# Altium PCB Control_Board-v1.0.PcbDoc (part 3 of 3)
Units mil, origin at the board's own origin, x right, y up, seen from the top; angles counter-clockwise.
Board outline 6234.87 x 2703.42 mil, 2 copper layers (Top Layer, Bottom Layer), stack 57 mil thick; 64 components, 54 nets, 227 pads, 139 vias.
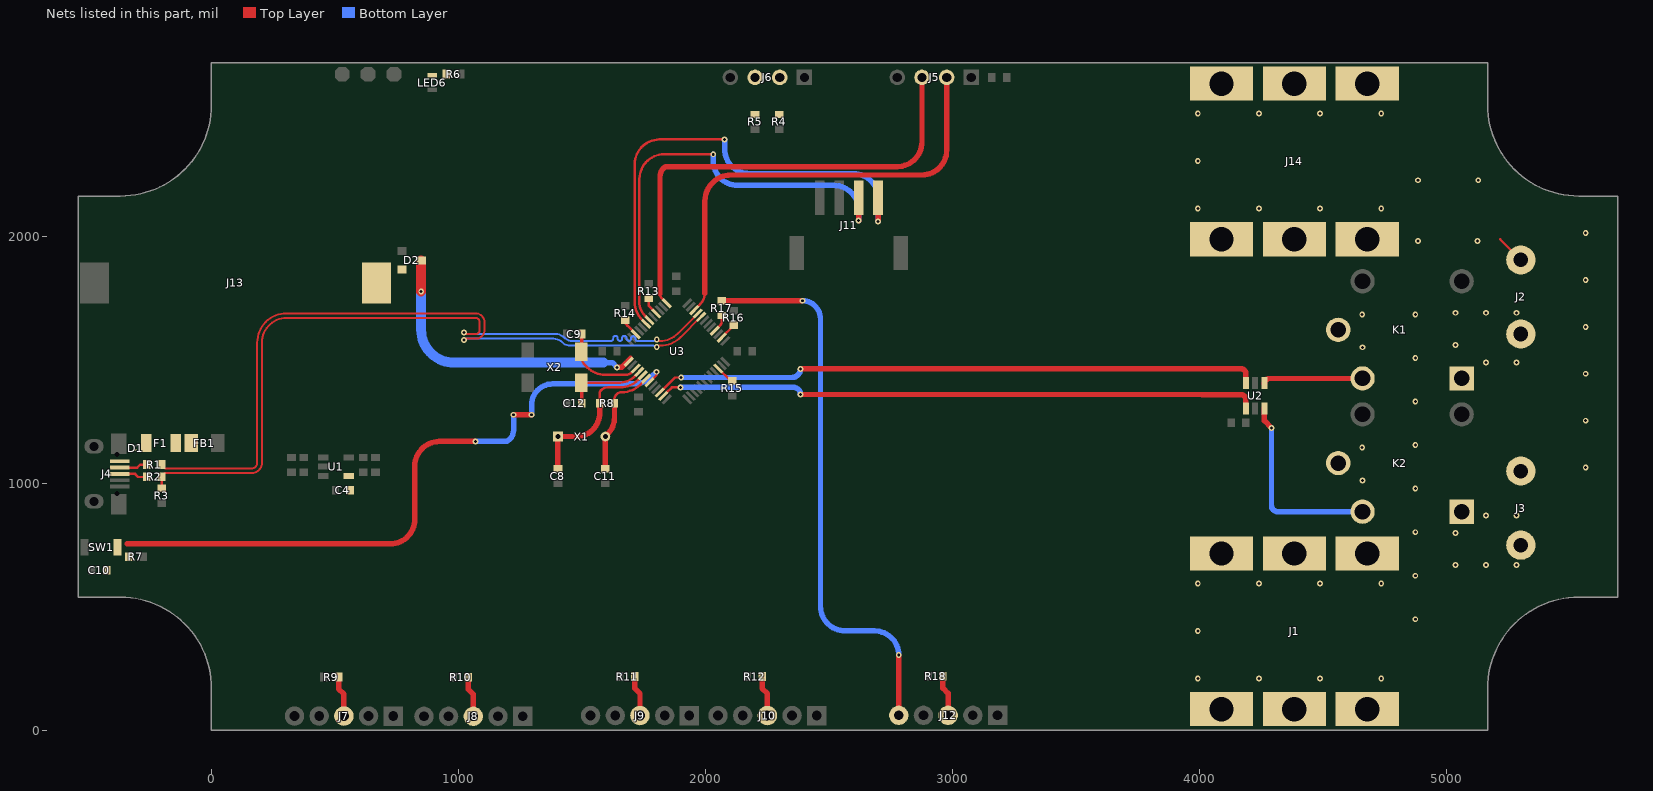
[diagram p2: the nets of this part, all layers, seen from the top]

## Via types
v1: diameter 23.62, hole 11.81, Top Layer to Bottom Layer, tented both sides, 131 vias
v2: diameter 23.62, hole 11.81, Top Layer to Bottom Layer, 8 vias

## Nets (pads, with @x,y where several pads share a name; then routed paths per layer and width w, separated by ;. In a path a pad name is that pad's centre, name@x,y a point inside that pad or via, vN(x,y) a via of type N, cw(c..) or ccw(c..) an arc to the next point about the centre after c; other vN are vias at no path point) (continued)
LED5_LAT: J12.5 R17.2 | length 2279.9
  Top Layer w22: R17.2@2066.23,1740.17 2066.32,1740.08 2392.92,1740.08 v1(2393,1740) ; J12.5@2783.23,61.17 v1(2783.23,305.17)
  Bottom Layer w22: v1(2393,1740) cw(c2393,1666.77) 2466.23,1666.77 2466.23,503.17 ccw(c2566.23,503.17) 2566.23,403.17 2684.51,403.17 cw(c2684.51,304.44) v1@2783.23,304.44
LIVE: J1.1 K1.5 K2.5
  other v1: 3994.28,209.98 4241.85,209.98 4489.43,209.98 4737,209.98 3994.28,402.49 4875,450 4241.85,595 4489.43,595 4737,595 4875,626.34 4875,802.68 4875,979.02 4661,1012 4660,1145 4875,1155.35 4875,1331.69 4875,1508.03 4661,1551.37 4660,1684.37 4875,1684.37
  other v2: 3994.28,595
NetC4_2: C4.2 U1.4
NetD1_1: D1.1 F1.1 J4.1
NetD2_2: D2.2 J13.1
NetF1_2: F1.2 FB1.1
NetJ4_2: J4.2 R1.1 | length 115
  Top Layer w10: J4.2@-371.43,1064.17 -300.79,1064.17 -288.38,1076.58 R1.1@-261.6,1076.58
NetJ4_3: J4.3 R2.1 | length 115.1
  Top Layer w10: J4.3@-371.43,1038.58 -309.18,1038.58 -296.77,1026.17 -262.01,1026.17 R2.1@-261.6,1026.58
NetJ6_2: J6.2 R4.2
NetJ6_3: J6.3 R5.2
NetJ7_3: J7.3 R9.1 | length 166.7
  Top Layer w22: R9.1@515.23,216.17 515.23,168.17 536.23,147.17 J7.3@536.23,58.17
NetJ8_3: J8.3 R10.1 | length 166.7
  Top Layer w22: R10.1@1039.23,215.17 1039.23,167.17 1060.23,146.17 J8.3@1060.23,57.17
NetJ9_3: J9.3 R11.1 | length 166.7
  Top Layer w22: R11.1@1714.23,218.17 1714.23,170.17 1735.23,149.17 J9.3@1735.23,60.17
NetJ10_3: J10.3 R12.1 | length 166.7
  Top Layer w22: R12.1@2230.23,218.17 2230.23,170.17 2251.23,149.17 J10.3@2251.23,60.17
NetJ12_3: J12.3 R18.1 | length 166.7
  Top Layer w22: R18.1@2962.23,219.17 2962.23,171.17 2983.23,150.17 J12.3@2983.23,61.17
NetLED6_2: LED6.2 R6.1
NEUTRAL: J2.2 J3.2 J14.1 | length 118.6
  Top Layer w10: 5218.4,1989 J2.2@5302.23,1905.17
  other v1: 5565,1064.36 5565,1254.29 5565,1444.21 5565,1634.14 5565,1824.07 5565,2014 3994.28,2112.9 4241.85,2112.9 4489.43,2112.9 4737,2112.9 3994.28,2305.41 4241.85,2497.92 4489.43,2497.92 4737,2497.92
  other v2: 4886,1982 5127,1982 4886,2228 5130,2228 3994.28,2497.92
NO_1: J2.1 K1.1
  other v1: 5161.59,1489.6 5285.18,1489.6 5038,1560.24 5038,1691.03 5161.59,1691.03 5285.18,1691.03
NO_2: J3.1 K2.1
  other v1: 5038,669.21 5161.59,669.21 5285.18,669.21 5038,800 5161.59,870.63 5285.18,870.63
OSC32_IN: C9.2 U3.3 X2.1 | length 301.1
  Top Layer w10: X2.1@1497.5,1533.16 1497.5,1516.42 ccw(c1550.42,1516.42) 1513,1479 1522.54,1469.46 ccw(c1593.25,1540.17) 1593.25,1440.17 1679.79,1440.17 ccw(c1679.79,1471.57) U3.3@1702,1449.37
  Top Layer w15: X2.1@1499.23,1565.56 C9.2@1499.23,1605.17
OSC32_OUT: C12.2 U3.4 X2.4 | length 310.5
  Top Layer w10: X2.4@1518.5,1407.18 1646.22,1407.18 ccw(c1646.22,1507.18) 1716.93,1436.46 U3.4@1732.12,1451.65
  Top Layer w15: X2.4@1497.5,1407.18 1499.23,1405.44 C12.2@1499.23,1325.17
OSC_IN: C8.2 R8.1 U3.5 X1.1 | length 634.1
  Top Layer w10: R8.1@1572.23,1325.17 1572.23,1365.1 cw(c1589.3,1365.1) 1577.23,1377.17 cw(c1606.2,1348.2) 1606.2,1389.17 1656.05,1389.17 ccw(c1656.05,1489.17) 1726.76,1418.46 U3.5@1746.04,1437.73
  Top Layer w22: C8.2@1403.11,1060.29 X1.1@1403.11,1190.17 1478.46,1190.17 ccw(c1478.46,1281.36) 1542.94,1216.88 ccw(c1472.23,1287.59) 1572.23,1287.59 R8.1@1572.23,1325.17
OSC_OUT: C11.2 R8.2 U3.6 X1.2 | length 453.6
  Top Layer w10: R8.2@1632.23,1325.17 1630.98,1337.67 1630.98,1338.29 cw(c1662.56,1337.74) 1655.35,1368.49 cw(c1657.6,1358.75) 1657.09,1368.74 ; 1657.13,1368.74 ccw(c1648.58,1550.93) 1684.69,1372.15 ccw(c1664.89,1470.17) 1735.6,1399.46 U3.6@1759.96,1423.81
  Top Layer w22: C11.2@1595.23,1060.17 X1.2@1595.23,1190.17 1602.94,1197.88 ccw(c1532.23,1268.59) 1632.23,1268.59 R8.2@1632.23,1325.17
PB1: R13.1 U3.40 | length 73.5
  Top Layer w10: R13.1@1771.23,1749.17 1771.23,1718.76 U3.40@1801.72,1688.28
PB2: R14.1 U3.46 | length 71.9
  Top Layer w10: R14.1@1675.23,1660.17 ccw(c1705.26,1660.17) 1684.03,1638.94 U3.46@1718.2,1604.76
PB3: R15.1 U3.22 | length 72.4
  Top Layer w10: U3.22@2052.27,1465.57 R15.1@2103.45,1414.39
PB4: R16.1 U3.26 | length 69.6
  Top Layer w10: U3.26@2066.19,1590.85 2066.19,1591.12 R16.1@2115.23,1640.17
PB5: R17.1 U3.28 | length 72.6
  Top Layer w10: U3.28@2038.35,1618.68 2061.57,1641.91 ccw(c2050.31,1653.17) 2066.23,1653.17 2066.23,1677.75 ccw(c2062.82,1677.75) R17.1@2065.23,1680.17
RELAY_1: U2.3 U3.10 | length 2468.6
  Top Layer w10: U3.10@1815.64,1368.13 1876.67,1429.17 v1(1902.23,1429.17)
  Top Layer w22: v1(2385.23,1464.17) 4169.83,1464.17 cw(c4169.83,1445) 4189,1445 4189.2,1445 U2.3@4189.2,1406.15
  Bottom Layer w22: v1(1902.23,1429.17) 2350.23,1429.17 ccw(c2350.23,1464.17) v1(2385.23,1464.17)
RELAY_2: U2.4 U3.11 | length 2439.6
  Top Layer w10: U3.11@1829.56,1354.21 1843.36,1367.3 1843,1367.66 1864.51,1389.17 v1(1899.23,1389.17)
  Top Layer w22: v1(2385.23,1360.17) 4011.74,1360.01 4166.36,1360.01 cw(c4166.36,1334.62) 4184.32,1352.57 cw(c4172.54,1340.79) 4189.2,1340.79 U2.4@4189.2,1303
  Bottom Layer w22: v1(1899.23,1389.17) 2356.23,1389.17 cw(c2356.23,1360.17) v1(2385.23,1360.17) v1@2384.79,1360.17
RELAY_O1: K1.4 U2.1 | length 409.2
  Top Layer w22: U2.1@4264,1404.15 cw(c4285.05,1404.15) 4285.05,1425.2 K1.4@4661.23,1425.2
RELAY_O2: K2.4 U2.6 | length 787.8
  Top Layer w22: U2.6@4264,1303 4264,1254.25 4292.81,1225.44 v2(4292.81,1225) v2@4291.97,1225
  Bottom Layer w22: v2(4292.81,1225) 4292.81,908.95 ccw(c4313.95,908.95) 4299,894 ccw(c4318.73,913.73) 4318.73,885.83 K2.4@4661.23,885.83
RST: C10.1 R7.2 SW1.1 U3.7 | length 2721
  Top Layer w10: U3.7@1773.88,1409.89 1802.23,1438.25 v1(1802.23,1452.17)
  Top Layer w22: -340.77,755.17 723.23,755.17 ccw(c723.23,855.17) 823.23,855.17 823.23,1070.17 cw(c923.23,1070.17) 923.23,1170.17 v1(1069.23,1170.17) ; v1(1223.23,1278.17) v1(1296.23,1278.17)
  Bottom Layer w22: v1(1069.23,1170.17) 1185.26,1170.17 ccw(c1185.26,1203.74) 1209,1180 ccw(c1174.64,1214.36) 1223.23,1214.36 v1(1223.23,1278.17) ; v1(1296.23,1278.17) 1296.23,1318.21 cw(c1380.79,1318.21) 1321,1378 cw(c1381.76,1317.24) 1381.76,1403.17 1711.81,1403.17 ccw(c1711.81,1503.17) 1782.52,1432.46 v1(1802.23,1452.17)
SCL: J11.3 U3.42 | length 1806.6
  Top Layer w10: U3.42@1773.88,1660.44 1755.92,1678.4 cw(c1812.41,1734.89) 1732.89,1727.17 1732.89,1765.59 1733.11,1786.33 1733.12,2103 1733.12,2233 cw(c1833.12,2233) 1833.12,2333 v1(2032,2333)
  Top Layer w22: v1(2620.74,2064.26) J11.3@2620.74,2157
  Bottom Layer w22: v1(2032,2333) 2032,2307 ccw(c2132,2307) 2132,2207 2520.74,2207 cw(c2520.74,2107) 2620.74,2107 v1(2620.74,2064.26)
SDA: J11.4 U3.43 | length 2044.6
  Top Layer w10: U3.43@1759.96,1646.52 1743.52,1662.96 cw(c1814.23,1733.67) 1714.23,1733.67 1714.25,2103 1714.25,2293 cw(c1814.25,2293) 1814.25,2393 v1(2078,2393)
  Top Layer w22: v1(2699.48,2061.48) J11.4@2699.48,2157
  Bottom Layer w22: v1(2078,2393) 2078,2355 ccw(c2178,2355) 2178,2255 2599.48,2255 cw(c2599.48,2155) 2699.48,2155 v1(2699.48,2061.48)
SWDCLK: J5.3 U3.37 | length 1926
  Top Layer w10: 1816.23,1768.17 ccw(c1842.52,1768.17) 1823.93,1749.58 U3.37@1843.48,1730.04
  Top Layer w22: 1816.23,1768.17 1816.23,2242.7 1816.23,2242.77 cw(c1863.23,2242.77) 1830,2276 cw(c1847.3,2258.7) 1847.3,2283.17 2777.23,2283.17 ccw(c2777.23,2383.17) 2877.23,2383.17 J5.3@2877.23,2643.17
SWDIO: J5.2 U3.34 | length 1846.9
  Top Layer w10: U3.34@1954.83,1702.2 1980.16,1727.53 ccw(c1936.52,1771.17) 1998.23,1771.17
  Top Layer w22: 1998.23,1771.17 1998.23,2144.59 cw(c2098.23,2144.59) 2024.94,2212.62 cw(c2098.23,2144.59) 2027.52,2215.3 2038.22,2225.99 cw(c2102.23,2149.17) 2102.23,2249.17 2877.23,2249.17 ccw(c2877.23,2349.17) 2977.23,2349.17 J5.2@2977.23,2643.17
USB_D_N: R1.2 U3.32 | length 3045.5
  Top Layer w8: R1.2@-201.6,1076.58 ccw(c-186.1,1076.58) -186.1,1061.08 163.15,1061.08 ccw(c163.15,1083.17) 185.23,1083.17 185.23,1570.17 cw(c304.23,1570.17) 304.23,1689.17 1069.13,1689.17 1069.23,1689.17 cw(c1069.23,1653.17) 1105.23,1653.17 1105.23,1621.17 cw(c1070.23,1621.17) 1070.23,1586.17 1029.04,1586.17 ccw(c1029.04,1580.36) v1(1023.23,1580.36) ; v1@1812.23,1558.17 1816.76,1558.17 ccw(c1816.76,1677.02) 1900.8,1592.98 1982.19,1674.36 U3.32@1982.67,1674.36
  Bottom Layer w8: v1(1023.23,1580.36) ccw(c1023.23,1590.47) 1030.38,1583.32 1033.23,1586.17 1386.06,1586.17 cw(c1386.06,1538.37) 1419.86,1572.17 ccw(c1453.66,1605.97) 1453.66,1558.17 1789.09,1558.17 cw(c1789.09,1548.25) 1796.1,1555.26 ccw(c1803.12,1562.28) 1803.12,1552.36 v1(1803.23,1552.36)
USB_D_P: R2.2 R3.2 U3.33 | length 3092.1
  Top Layer w8: R2.2@-201.6,1026.58 cw(c-186.1,1026.58) -186.1,1042.08 163.15,1042.08 ccw(c163.15,1083.17) 204.23,1083.17 204.23,1570.17 cw(c304.23,1570.17) 304.23,1670.17 1069.23,1670.17 cw(c1069.23,1653.17) 1086.23,1653.17 1086.23,1621.17 cw(c1070.23,1621.17) 1070.23,1605.17 1029.04,1605.17 cw(c1029.04,1610.98) v1(1023.23,1610.98) ; v1@1812.23,1577.17 1816.7,1577.17 ccw(c1816.7,1677.17) 1887.41,1606.46 1968.75,1687.8 U3.33@1968.75,1688.28
  Top Layer w10: R3.2@-201.6,980 R2.2@-201.6,1026.58
  Bottom Layer w8: v1(1023.23,1610.98) cw(c1023.23,1600.87) 1030.38,1608.02 1033.23,1605.17 1393.93,1605.17 cw(c1393.93,1557.37) 1427.73,1591.17 ccw(c1461.53,1624.97) 1461.53,1577.17 1614,1577.17 1618,1577.17 ccw(c1618,1586.17) 1627,1586.17 1627,1588.86 cw(c1636,1588.86) 1645,1588.86 1645,1586.17 ccw(c1654,1586.17) 1663,1586.17 1663,1588.86 cw(c1672,1588.86) 1681,1588.86 1681,1586.17 ccw(c1690,1586.17) 1699,1586.17 1699,1587.27 cw(c1708,1587.27) 1717,1587.27 1717,1586.17 ccw(c1726,1586.17) 1726,1577.17 1779,1577.17 1789.09,1577.17 ccw(c1789.09,1587.09) 1796.1,1580.07 cw(c1803.12,1573.06) 1803.12,1582.98 v1(1803.23,1582.98)
VBAT: D2.3 U3.1 | length 1214.5
  Top Layer w22: v1(1642.23,1470.17) 1642.54,1470.48 1660.78,1470.48 U3.1@1677.83,1487.53 ; U3.1@1686.89,1496.88 U3.1@1696.96,1506.95
  Top Layer w40: v1(849.23,1777.17) D2.3@849.23,1902.83
  Bottom Layer w22: 1588.23,1489.17 1623.23,1489.17 v1(1642.23,1470.17)
  Bottom Layer w40: v1(849.23,1777.17) 849.23,1622.17 ccw(c982.23,1622.17) 982.23,1489.17 1588.23,1489.17
pads on no net: J4. K1.2 K2.2 U3.2 U3.12 U3.13 U3.14 U3.15 U3.16 U3.17 U3.18 U3.19 U3.29 U3.30 U3.31 U3.38 U3.41

## Polygon pours and split planes (outlines as drawn)
GND on Bottom Layer "Top_Layer" (solid, remove dead copper, pour order 1): 0,0 0,170.61 ccw(c-368.76,170.61) -368.76,539.37 -539.37,539.37 -539.37,2164.05 -368.76,2164.05 ccw(c-368.76,2532.81) 0,2532.81 0,2703.42 3851,2703.42 3851,0
5V on Bottom Layer "5V_L02_P000" (solid, remove dead copper, pour order 0): 507.23,193.17 2924.23,193.17 2924.23,17.17 275.23,17.17 275.23,1005.17 -17.3,1005.17 -17.3,1155.17 593.23,1155.17 593.23,2427.17 671.23,2427.17 671.23,1102.17 507.23,1102.17
GND on Top Layer "Top_Layer" (solid, remove dead copper, pour order 4): 0,0 0,170.61 ccw(c-368.76,170.61) -368.76,539.37 -539.37,539.37 -539.37,2164.05 -368.76,2164.05 ccw(c-368.76,2532.81) 0,2532.81 0,2703.42 3851.88,2703.42 3851.88,0

## Other copper
Top Layer:
  rectangle net LIVE: 4504,1516 4904,1724
  rectangle net 5V: 4174,1147 4238,1263.5
  rectangle net NEUTRAL: 4789,1917.11 5234,2283.77
  rectangle net NO_2: 5008,636.23 5155.9,946
  rectangle net LIVE: 4775,337.68 4967,1724
  rectangle net NO_2: 5253.56,636 5382.07,891.33
  rectangle net NO_2: 5150,636 5260.48,891.33
  rectangle net NO_1: 5258,1522.15 5377,1736.79
  rectangle net NO_1: 5136.61,1451.17 5311,1736.79
  rectangle net NO_1: 5008,1367 5155.9,1736.79
  rectangle net NEUTRAL: 5214,2070 5679,2137
  rectangle net NEUTRAL: 3960,1917.14 4858,2693
  rectangle net NEUTRAL: 5210.23,1786 5679,2078
  rectangle net LIVE: 3963,631 4954,784
  rectangle net LIVE: 3958.23,12.56 4840,788.73
  rectangle net LIVE: 4504,982 4904,1181
  rectangle net NEUTRAL: 5215,935 5679,1245
  rectangle net NEUTRAL: 5348,1147.52 5680,1464.76
  rectangle net NEUTRAL: 5445,935 5679,2053
  rectangle net GND: 2174.23,1488.17 2204.23,1552.17
  rectangle net NEUTRAL: 5210.23,1817 5675,1980.17
  rectangle net 3V3: 529.23,1923.17 794.23,2004.17
  rectangle net 3V3: 760.23,2583 916.23,2614.17
  rectangle net NetLED6_2: 869.23,2638.17 967.23,2679.17
  rectangle net 5V: 598.23,2392.17 673.23,2693.23
  rectangle net GND: 1385.23,983.17 1611.23,1017.17
  rectangle net GND: 1254.23,1368.17 1307.23,1571.17
  rectangle net GND: 512.23,1063.17 682.23,1080.17
  rectangle net GND: 596.23,1002.17 682.23,1072.17
  region net RST: -315.77,777.17 -439.77,777.17 -439.77,627.17 -315.77,627.17
  rectangle net 5V: 2842.23,17.17 2923.23,237.17
  rectangle net 5V: 2104,16.17 2197,236.17
  rectangle net 5V: 1589,16.17 1681,236.17
  rectangle net 5V: 916,13.17 1005,233.17
  rectangle net 3V3: 532.23,1089.17 736,1127
  rectangle net NetC4_2: 531.23,953.17 577.23,1044.17
  rectangle net GND: 487.23,953.17 519.23,1080.17
  rectangle net GND: 300.23,1026.17 392.23,1061.17
  rectangle net GND: 300.23,1056.17 519.23,1080.17
  rectangle net 5V: 300.23,1090.17 478.23,1155.17
  rectangle net 5V: -14.77,1090.17 55.23,1203.17
  rectangle net NetF1_2: -167.45,1122.17 -50.77,1203.17
  rectangle net NetD1_1: -287.77,1122.17 -239.77,1203.17
  rectangle net NetD1_1: -317.77,1122.17 -239.77,1140.17
  rectangle net NetD1_1: -319.77,1081.17 -300.77,1140.17
  rectangle net NetD1_1: -404.77,1081.17 -300.77,1098.17
  rectangle net VBAT: 829.23,1886.17 869.23,1926.17
  region net VBAT: 1677.18,1471.22 1713.68,1507.72 1697.73,1523.67 1661.23,1487.17
  rectangle net 5V: 392,14.17 481,234.17
  rectangle net 3V3: 3044.23,2606.17 3180.23,2688.17
  rectangle net 3V3: 702.23,1923.17 794.23,2691.17
  rectangle net NetJ6_2: 2261.23,2478.17 2340.23,2688.17
  rectangle net NetJ6_3: 2161.23,2478.17 2240.23,2688.17
  rectangle net NetD2_2: 607.23,1716.17 811.23,1898.17
  region net LIVE: 4809.01,168.39 4965.97,337.68 4965.97,347 4749.01,347 4749.01,168.39
  region net NEUTRAL: 5234,2283.77 5430.88,2123 5245,2123 5228,2106 5210.23,2123.77 5210.23,2283.77
  region net 3V3: 1948.23,1794 1948.23,1744.17 1909.23,1705.17 1862,1752.4 1862,1794
  region net 3V3: 1675.2,1600.2 1710.7,1564.7 1671,1525 1671,1514.17 1628,1514.17 1628,1553
  region net 3V3: 2145,1554.17 2145,1473.17 2122.23,1473.17 2092.23,1473.17 2036.4,1529 2107,1529 2107,1554.17
Bottom Layer:
  rectangle net LIVE: 4775,392.28 4967,1715
  rectangle net NO_1: 5008,1367 5156,1736.5
  rectangle net NO_2: 5008,836.61 5156,946
  rectangle net NO_2: 5008,636.23 5382.14,891.36
  rectangle net NO_1: 5149,1451.17 5311,1538.45
  rectangle net NO_1: 5133,1522.21 5377,1736.79
  rectangle net NEUTRAL: 5348,1233 5520,1464.76
  rectangle net NEUTRAL: 5215,935 5473,1245
  rectangle net LIVE: 4504,1516 4967,1724
  rectangle net LIVE: 4504,982 4808,1182
  rectangle net LIVE: 3958.18,13.48 4839,788.74
  rectangle net NEUTRAL: 5326,2074 5679,2137
  rectangle net NEUTRAL: 4792,1917 5234,2283.77
  rectangle net NEUTRAL: 3959,1917 4860,2693
  rectangle net NEUTRAL: 5445,935 5679,2053
  rectangle net NEUTRAL: 5210.23,1786 5679,2137
  region net LIVE: 4809.01,168.39 4967,338.79 4967,409 4749.01,409 4749.01,168.39
  region net NEUTRAL: 5234,2283.77 5430.88,2123 5245,2123 5228,2106 5210.23,2123.77 5210.23,2283.77

## Silkscreen, mask and mechanical layers (free items; w line width, h text height)
Top Overlay:
  drawing of 9 lines, arcs and shapes, not listed
  text "BOOT" at 2048.78,2525.19 h80
  text "J-LINK" at 2724.78,2524.19 h80
  text "3V3" at 868.3,2514.86 h80
  text "GND" at 562.99,2433.21 h80 r90
  text "5V" at 667.99,2433.21 h80 r90
  text "3V3" at 772.99,2433.21 h80 r90
  text "LCD HEADER" at 2339.26,2230.47 h80
  text "NEUTRAL" at 3966.17,1812.69 h70
  text "NEUTRAL" at 5205,1786.88 h70 r90
  text "NO_1" at 5207.79,1450.17 h65 r90
  text "120V 10A" at 4458,1432.05 h45 r90
  text "BATERY" at -349,1427.19 h80
  text "USB" at -532.74,1205.69 h80
  text "NEUTRAL" at 5205,932.88 h70 r90
  text "120V 10A" at 4452,932.35 h45 r90
  text "LIVE" at 3962,828.69 h80
  text "RST" at -523.49,794.41 h80 r0.21
  text "NO_2" at 5207.79,595.58 h65 r90
  text "PUMP" at 2733.78,114.19 h80
  text "SET BUTTON" at 1485.78,113.19 h80
  text "LIGHT" at 2001.78,113.19 h80
  text "BUTTON+" at 286.78,111.19 h80
  text "BUTTON-" at 810.78,110.19 h80
  text "V1.1" at 4851.17,4.69 h70
Bottom Overlay:
  drawing of 74 lines, arcs and shapes, not listed
  text "ZERO CARBON FOOTPRINT" at 1176,1977 h40
  text "120V 10A" at 4375,1523.6 h55 r90
  text "-" at 2855.56,160.83 h300 r90
  text "-" at 1607.56,159.83 h300 r90
  text "-" at 2123.56,159.83 h300 r90
  text "-" at 408.56,157.83 h300 r90
  text "-" at 932.56,156.83 h300 r90
  text "+" at 2846.72,145.77 h163
  text "+" at 1598.72,144.77 h163
  text "+" at 2114.72,144.77 h163
  text "+" at 399.72,142.77 h163
  text "+" at 923.72,141.77 h163
  text "NC" at 2940,112.86 h110 r270
  text "NO" at 3039.95,112.86 h110 r270
  text "COM" at 3140.5,112.69 h80 r270
  text "NC" at 1692,111.86 h110 r270
  text "NO" at 1791.95,111.86 h110 r270
  text "COM" at 1892.5,111.69 h80 r270
  text "NC" at 2208,111.86 h110 r270
  text "NO" at 2307.95,111.86 h110 r270
  text "COM" at 2408.5,111.69 h80 r270
  text "NC" at 493,109.86 h110 r270
  text "NO" at 592.95,109.86 h110 r270
  text "COM" at 693.5,109.69 h80 r270
  text "NC" at 1017,108.86 h110 r270
  text "NO" at 1116.95,108.86 h110 r270
  text "COM" at 1217.5,108.69 h80 r270
Board_Outline:
  lines w5: 3950.66,807.99 ccw(c3960.63,807.99) 3960.63,798.02 4744,798.85 4763,817.85 4763,948.85 4741.85,970 4518.15,970 4518,969.85 ; 3950.66,808.01 cw(c3960.63,808.01) 3960.63,817.98 4735,818.85 4744,827.85 4744,934.85 4729,949.85 4519,949.85 ; 4036.01,646.3 cw(c4036.01,656.3) 4026.01,656.3 cw(c4036.01,656.3) 4036.01,666.3 ; 4509.66,959.99 ccw(c4519.63,959.99) 4519.63,950.02 ; 4509.66,960.01 cw(c4519.63,960.01) 4519.63,969.98 ; 4519,1734.72 4741.85,1734.72 4763,1755.87 4763,1886.87 4744,1905.87 3960.63,1906.71 ccw(c3960.63,1896.74) 3950.66,1896.74 ccw(c3960.63,1896.71) 3960.63,1886.74 4735,1885.87 4744,1876.87 4744,1769.87 4729,1754.87 4519,1754.87 ; 4519.63,1734.74 cw(c4519.63,1744.71) 4509.66,1744.71 cw(c4519.63,1744.74) 4519.63,1754.71 ; 4523,1195.72 4745.85,1195.72 4767,1216.87 4767,1485 4765,1487 ; 4523,1215.87 4733,1215.87 4746,1228.87 4746,1473.13 4733,1486.13 4523,1486.13 ; 4523,1506.28 4745.85,1506.28 4767,1485.13 ; 4523.63,1195.74 cw(c4523.63,1205.71) 4513.66,1205.71 cw(c4523.63,1205.74) 4523.63,1215.71 ; 4523.63,1486.29 cw(c4523.63,1496.26) 4513.66,1496.26 cw(c4523.63,1496.29) 4523.63,1506.26 ; 4978,1725.45 4978,628.81 5004.96,601.85 5116.82,601.85 ccw(c5116.82,611.85) 5126.82,611.85 ccw(c5116.82,611.85) 5116.82,621.85 5011.92,621.85 4998,635.77 4998,1725.45 ; 4978,1726.5 cw(c4988,1726.5) 4988,1736.5 cw(c4988,1726.5) 4998,1726.5 ; 5387.13,1494.7 5339.04,1494.7 cw(c5339.04,1504.7) 5329.04,1504.7 cw(c5339.04,1504.7) 5339.04,1514.7 5380.7,1514.7 5412.04,1546.03 5412.04,1721.6 ; 5387.13,1772.46 5219.04,1772.46 ccw(c5219.04,1762.46) 5209.04,1762.46 ccw(c5219.04,1762.46) 5219.04,1752.46 5380.7,1752.46 5412.04,1721.12 ; 5388.24,1494.7 5432.04,1538.5 5432.04,1728.03 ; 5388.24,1772.46 5432.04,1728.66 ; 4469,1002 ccw(c4479,1002) 4479,992 ccw(c4479,1002) 4489,1002 4489,1156.05 ccw(c4479,1156.05) 4479,1166.05 ccw(c4479,1156.05) 4469,1156.05 4469,1002 ; 4469,1541.37 ccw(c4479,1541.37) 4479,1531.37 ccw(c4479,1541.37) 4489,1541.37 4489,1695.42 ccw(c4479,1695.42) 4479,1705.42 ccw(c4479,1695.42) 4469,1695.42 4469,1541.37 ; 5169,912.96 cw(c5179,912.96) 5179,922.96 5393.03,923.4 cw(c5393.03,913.4) 5403.03,913.4 cw(c5393.03,913.4) 5393.03,903.4 5179,902.96 cw(c5179,912.96) 5169,912.96
  lines w10: -539.37,539.37 -368.76,539.37 cw(c-368.76,170.61) 0,170.61 0,0 5167.99,0 5167.99,170.61 cw(c5536.75,170.61) 5536.75,539.37 5695.5,539.37 5695.5,2164.05 5536.75,2164.05 cw(c5536.75,2532.81) 5167.99,2532.81 5167.99,2703.42 0,2703.42 0,2532.81 cw(c-368.76,2532.81) -368.76,2164.05 -539.37,2164.05 -539.37,539.37
Board Dimensions:
  lines w10: -73.49,1288.72 ccw(c-73.49,1351.71) -73.49,1414.7 ccw(c-73.49,1351.71) -73.49,1288.72 ; 192.26,146.99 ccw(c192.26,209.98) 192.26,272.97 ccw(c192.26,209.98) 192.26,146.99 ; 192.26,2430.45 ccw(c192.26,2493.44) 192.26,2556.44 ccw(c192.26,2493.44) 192.26,2430.45 ; 1402.89,146.99 ccw(c1402.89,209.98) 1402.89,272.97 ccw(c1402.89,209.98) 1402.89,146.99 ; 1402.89,2430.45 ccw(c1402.89,2493.44) 1402.89,2556.44 ccw(c1402.89,2493.44) 1402.89,2430.45 ; 2583.99,146.99 ccw(c2583.99,209.98) 2583.99,272.97 ccw(c2583.99,209.98) 2583.99,146.99 ; 2583.99,2430.45 ccw(c2583.99,2493.44) 2583.99,2556.44 ccw(c2583.99,2493.44) 2583.99,2430.45 ; 3765.1,146.99 ccw(c3765.1,209.98) 3765.1,272.97 ccw(c3765.1,209.98) 3765.1,146.99 ; 3765.1,2430.45 ccw(c3765.1,2493.44) 3765.1,2556.44 ccw(c3765.1,2493.44) 3765.1,2430.45 ; 4975.73,146.99 ccw(c4975.73,209.98) 4975.73,272.97 ccw(c4975.73,209.98) 4975.73,146.99 ; 4975.73,2430.45 ccw(c4975.73,2493.44) 4975.73,2556.44 ccw(c4975.73,2493.44) 4975.73,2430.45 ; 5241.48,1288.72 ccw(c5241.48,1351.71) 5241.48,1414.7 ccw(c5241.48,1351.71) 5241.48,1288.72
Fabrication:
  drawing of 191 lines, arcs and shapes, not listed
  text "Layer" at 6492.58,3060 h60
  text "Name" at 6902.49,3060 h60
  text "Material" at 7832.23,3060 h60
  text "Thickness" at 8692,3060 h60
  text "Constant" at 9341.84,3060 h60
  text "Board Layer Stack" at 9911.7,3060 h60
  text "Top Overlay" at 6902.49,2940 h60
  text "Top Solder" at 6902.49,2820 h60
  text "Solder Resist" at 7832.23,2820 h60
  text "3.00mil" at 8692,2820 h60
  text "3.5" at 9341.84,2820 h60
  text "1" at 6492.58,2700 h60
  text "Top Layer" at 6902.49,2700 h60
  text "10.00mil" at 8692,2700 h60
  text "Dielectric 1" at 6902.49,2580 h60
  text "FR-4" at 7832.23,2580 h60
  text "37.00mil" at 8692,2580 h60
  text "4.8" at 9341.84,2580 h60
  text "2" at 6492.58,2460 h60
  text "Bottom Layer" at 6902.49,2460 h60
  text "10.00mil" at 8692,2460 h60
  text "Bottom Solder" at 6902.49,2340 h60
  text "Solder Resist" at 7832.23,2340 h60
  text "3.00mil" at 8692,2340 h60
  text "3.5" at 9341.84,2340 h60
  text "Bottom Overlay" at 6902.49,2220 h60
  text "Total board thickness:" at 6492.58,2100 h60
  text "63.00mil" at 8692,2100 h60
Drill Drawing:
  circle w10: c-382.38,4848.27 r33.33
  circle w10: c-382.38,4098.27 r20
  circle w10: c-382.38,4098.27 r33.33
  lines w10: -415.71,4214.94 -382.38,4231.61 -349.04,4214.94 -365.71,4248.27 -349.04,4281.61 -382.38,4264.94 -415.71,4281.61 -399.04,4248.27 -415.71,4214.94 ; -415.71,4381.61 -399.04,4381.61 -382.38,4364.94 -365.71,4381.61 -349.04,4381.61 -365.71,4398.27 -349.04,4414.94 -365.71,4414.94 -382.38,4431.61 -399.04,4414.94 -415.71,4414.94 -399.04,4398.27 -415.71,4381.61 ; -415.71,4514.94 -415.71,4531.61 -399.04,4548.27 -415.71,4564.94 -415.71,4581.61 -399.04,4581.61 -382.38,4564.94 -365.71,4581.61 -349.04,4581.61 -349.04,4564.94 -365.71,4548.27 -349.04,4531.61 -349.04,4514.94 -365.71,4514.94 -382.38,4531.61 -399.04,4514.94 -415.71,4514.94 ; -415.71,4664.94 -349.04,4664.94 -349.04,4731.61 -415.71,4731.61 -415.71,4664.94 ; -415.71,5031.61 -349.04,5031.61 -382.38,4964.94 -415.71,5031.61 ; -415.71,5131.61 -399.04,5131.61 -399.04,5114.94 -365.71,5114.94 -365.71,5131.61 -349.04,5131.61 -349.04,5164.94 -365.71,5164.94 -365.71,5181.61 -399.04,5181.61 -399.04,5164.94 -415.71,5164.94 -415.71,5131.61 ; -415.71,5298.27 -382.38,5264.94 -349.04,5298.27 -382.38,5331.61 -415.71,5298.27
  lines w15: -475.5,4019.94 11071.21,4019.94 ; -475.5,5369.94 11071.21,5369.94 ; 75.38,3869.94 75.38,5519.94 ; 675.22,3869.94 675.22,5519.94 ; 1774.9,3869.94 1774.9,5519.94 ; 2280.77,3869.94 2280.77,5519.94 ; 3014.57,3869.94 3014.57,5519.94 ; 4514.13,3869.94 4514.13,5519.94 ; 5103.97,3869.94 5103.97,5519.94 ; 5849.77,3869.94 5849.77,5519.94 ; 8518.94,3869.94 8518.94,5519.94 ; 9668.61,3869.94 9668.61,5519.94 ; -475.5,3869.94 11071.21,3869.94 11071.21,5519.94 -475.5,5519.94 -475.5,3869.94
  text "Symbol" at -385.5,5414.94 h72
  text "Count" at 120.38,5414.94 h72
  text "Hole Size" at 720.22,5414.94 h72
  text "Plated" at 1819.9,5414.94 h72
  text "Hole Type" at 2325.77,5414.94 h72
  text "Drill Layer Pair" at 3059.57,5414.94 h72
  text "Via/Pad" at 4559.13,5414.94 h72
  text "Pad Shape" at 5148.97,5414.94 h72
  text "Template" at 5894.77,5414.94 h72
  text "Hole Length" at 8563.94,5414.94 h72
  text "Routed Path Length" at 9713.61,5414.94 h72
  text "139" at 120.38,5264.94 h60
  text "11.81mil (0.300mm)" at 720.22,5264.94 h60
  text "PTH" at 1819.9,5264.94 h60
  text "Round" at 2325.77,5264.94 h60
  text "Top Layer - Bottom Layer" at 3059.57,5264.94 h60
  text "Via" at 4559.13,5264.94 h60
  text "Rounded" at 5148.97,5264.94 h60
  text "(Mixed)" at 5894.77,5264.94 h60
  text "-" at 8563.94,5264.94 h60
  text "-" at 9713.61,5264.94 h60
  text "2" at 120.38,5114.94 h60
  text "19.69mil (0.500mm)" at 720.22,5114.94 h60
  text "PTH" at 1819.9,5114.94 h60
  text "Round" at 2325.77,5114.94 h60
  text "Top Layer - Bottom Layer" at 3059.57,5114.94 h60
  text "Pad" at 4559.13,5114.94 h60
  text "(Mixed)" at 5148.97,5114.94 h60
  text "(Mixed)" at 5894.77,5114.94 h60
  text "-" at 8563.94,5114.94 h60
  text "-" at 9713.61,5114.94 h60
  text "2" at 120.38,4964.94 h60
  text "19.69mil (0.500mm)" at 720.22,4964.94 h60
  text "NPTH" at 1819.9,4964.94 h60
  text "Round" at 2325.77,4964.94 h60
  text "Top Layer - Bottom Layer" at 3059.57,4964.94 h60
  text "Pad" at 4559.13,4964.94 h60
  text "Rounded" at 5148.97,4964.94 h60
  text "c0hn50p-1" at 5894.77,4964.94 h60
  text "-" at 8563.94,4964.94 h60
  text "-" at 9713.61,4964.94 h60
  text "2" at 120.38,4814.94 h60
  text "35.43mil (0.900mm)" at 720.22,4814.94 h60
  text "PTH" at 1819.9,4814.94 h60
  text "Slot" at 2325.77,4814.94 h60
  text "Top Layer - Bottom Layer" at 3059.57,4814.94 h60
  text "Pad" at 4559.13,4814.94 h60
  text "Rounded" at 5148.97,4814.94 h60
  text "r150_200h90_140r100m155_205mx155_205p150_200" at 5894.77,4814.94 h60
  text "55.12mil (1.400mm)" at 8563.94,4814.94 h60
  text "19.68mil (0.500mm)" at 9713.61,4814.94 h60
  text "8" at 120.38,4664.94 h60
  text "37.40mil (0.950mm)" at 720.22,4664.94 h60
  text "PTH" at 1819.9,4664.94 h60
  text "Round" at 2325.77,4664.94 h60
  text "Top Layer - Bottom Layer" at 3059.57,4664.94 h60
  text "Pad" at 4559.13,4664.94 h60
  text "(Mixed)" at 5148.97,4664.94 h60
  text "(Mixed)" at 5894.77,4664.94 h60
  text "-" at 8563.94,4664.94 h60
  text "-" at 9713.61,4664.94 h60
  text "25" at 120.38,4514.94 h60
  text "39.37mil (1.000mm)" at 720.22,4514.94 h60
  text "PTH" at 1819.9,4514.94 h60
  text "Round" at 2325.77,4514.94 h60
  text "Top Layer - Bottom Layer" at 3059.57,4514.94 h60
  text "Pad" at 4559.13,4514.94 h60
  text "(Mixed)" at 5148.97,4514.94 h60
  text "(Mixed)" at 5894.77,4514.94 h60
  text "-" at 8563.94,4514.94 h60
  text "-" at 9713.61,4514.94 h60
  text "4" at 120.38,4364.94 h60
  text "59.06mil (1.500mm)" at 720.22,4364.94 h60
  text "PTH" at 1819.9,4364.94 h60
  text "Round" at 2325.77,4364.94 h60
  text "Top Layer - Bottom Layer" at 3059.57,4364.94 h60
  text "Pad" at 4559.13,4364.94 h60
  text "Rounded" at 5148.97,4364.94 h60
  text "c300h150" at 5894.77,4364.94 h60
  text "-" at 8563.94,4364.94 h60
  text "-" at 9713.61,4364.94 h60
  text "10" at 120.38,4214.94 h60
  text "62.99mil (1.600mm)" at 720.22,4214.94 h60
  text "PTH" at 1819.9,4214.94 h60
  text "Round" at 2325.77,4214.94 h60
  text "Top Layer - Bottom Layer" at 3059.57,4214.94 h60
  text "Pad" at 4559.13,4214.94 h60
  text "(Mixed)" at 5148.97,4214.94 h60
  text "(Mixed)" at 5894.77,4214.94 h60
  text "-" at 8563.94,4214.94 h60
  text "-" at 9713.61,4214.94 h60
  text "12" at 120.38,4064.94 h60
  text "98.43mil (2.500mm)" at 720.22,4064.94 h60
  text "PTH" at 1819.9,4064.94 h60
  text "Rectangle" at 2325.77,4064.94 h60
  text "Top Layer - Bottom Layer" at 3059.57,4064.94 h60
  text "Pad" at 4559.13,4064.94 h60
  text "Rectangle" at 5148.97,4064.94 h60
  text "r650_350h250_557" at 5894.77,4064.94 h60
  text "219.29mil (5.570mm)" at 8563.94,4064.94 h60
  text "219.29mil (5.570mm)" at 9713.61,4064.94 h60
  text "204 Total" at 120.38,3914.94 h60
  text "Slot definitions :" at -385.5,3769.97 h60
  text "Routed Path Length" at 647.19,3769.97 h60
  text "= Calculated from tool start centre position to tool end centre position." at 1749.86,3769.97 h60
  text "Hole Length" at 647.19,3669.99 h60
  text "= Routed Path Length + Tool Size = Slot length as defined in the PCB layout" at 1339.99,3669.99 h60

## Dimensions
-539.37,2164.05 to 5695.5,2164.05 on Board Dimensions
5167.99,2703.42 to 5167.99,0 on Board Dimensions

## Text inside footprints (layer, text, board x,y; h text height)
J4: Top Overlay "PCB Edge" at -510.14,1094.13 h31.5 r270
J11: Top Overlay "PCB Edge" at 2472.26,1881.9 h47.24